# Altium PCB Zybo_Z7_Pcb.PcbDoc (part 2 of 8)
Units mm, origin at the board's own origin, x right, y up, seen from the top; angles counter-clockwise.
Board outline 122 x 88 mm, 8 copper layers (Top Layer, Layer 2, Layer 3, Layer 4, Layer 5, Layer 6, Layer 7, Bottom Layer), stack 1.625 mm thick; 658 components, 558 nets, 2538 pads, 924 vias.
Unrouted connection lines stored in the file: 1229.
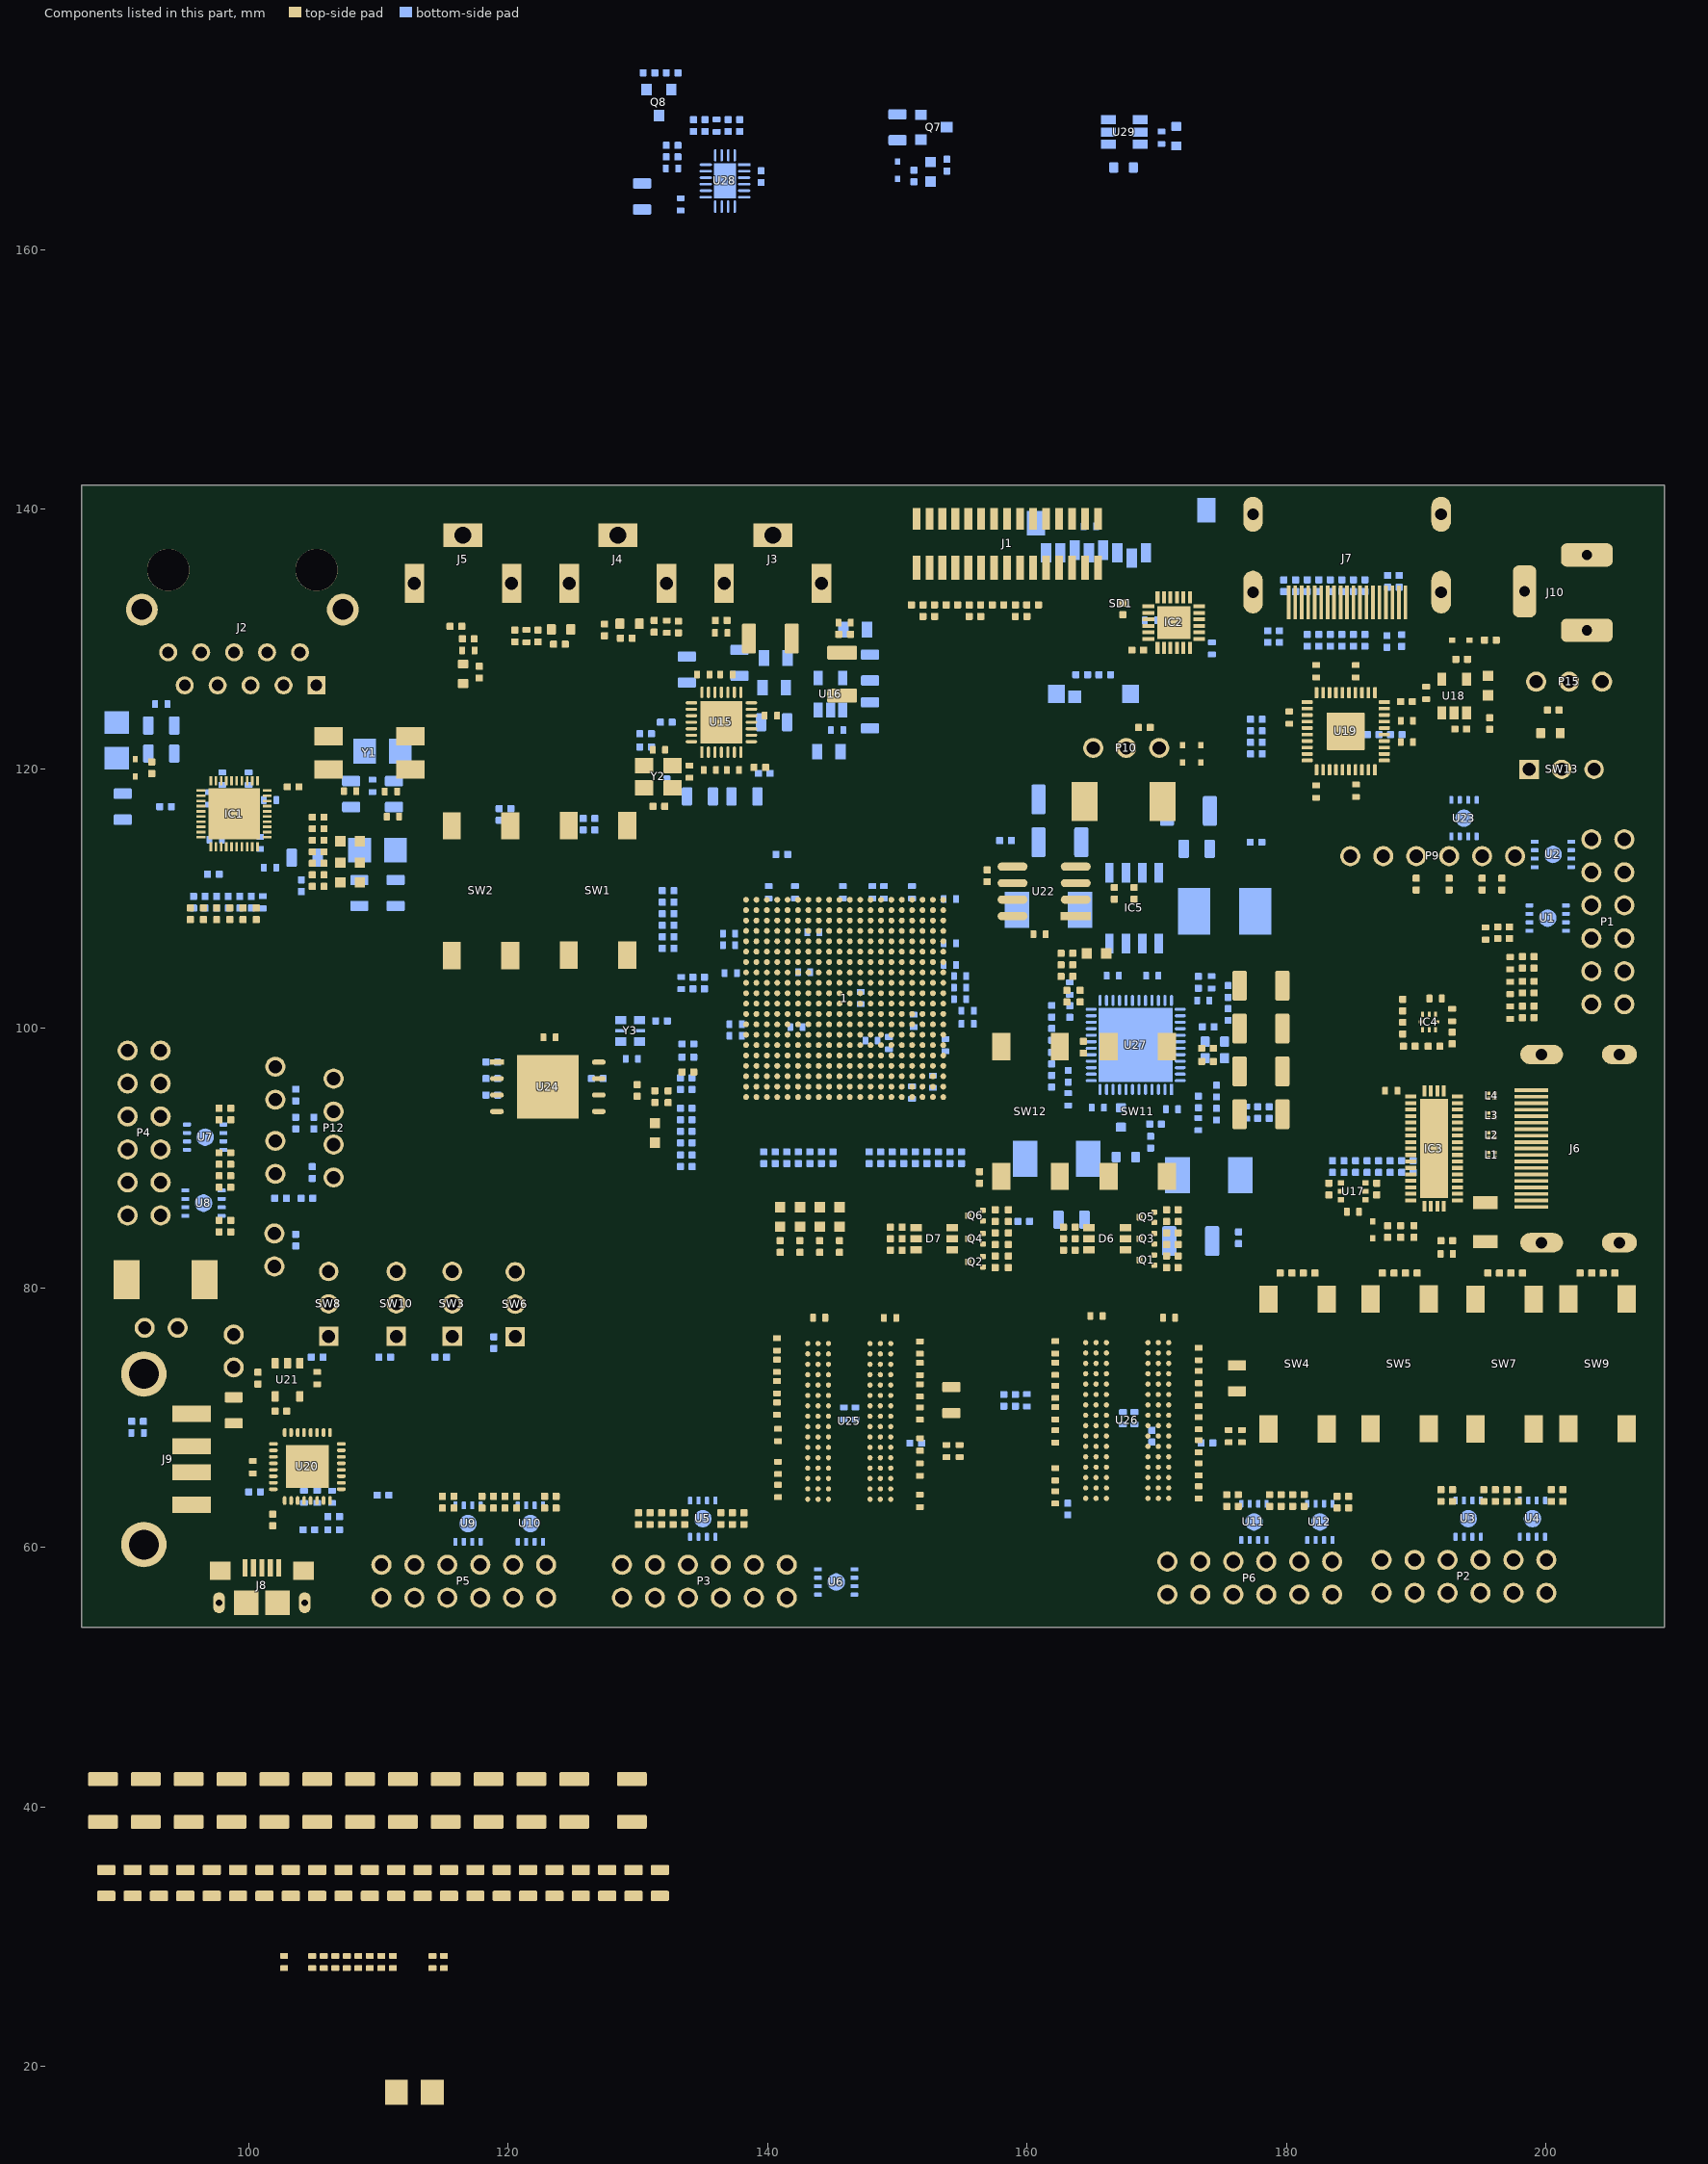
[diagram p8: the components of this part, seen from the top]

## Components (designator, comment, footprint, x,y, rotation, side; value= is the part's Value field where it differs from the comment) (continued)
C109 "470n" CAPC1005X50N_0402 110.236,28.067 r90 top
C110 "470n" CAPC1005X50N_0402 155.423,101.371 r0 bottom
C111 "47u" C_1210 121.793,40.513 r90 top
C112 "470n" CAPC1005X50N_0402 154.051,106.553 r180 bottom
C113 "470n" CAPC1005X50N_0402 154.051,104.902 r180 bottom
C114 "470n" CAPC1005X50N_0402 142.113,110.49 r270 bottom
C115 "470n" CAPC1005X50N_0402 137.541,100.33 r0 bottom
C116 "470n" CAPC1005X50N_0402 137.541,99.441 r0 bottom
C117 "4u7" C_0805 119.507,34.163 r90 top
C118 "4u7" C_0805 121.539,34.163 r90 top
C119 "4u7" C_0805 123.571,34.163 r90 top
C120 "100u" C_1210 118.491,40.513 r90 top
C121 "4u7" C_0805 103.251,34.163 r90 top
C122 "470n" CAPC1005X50N_0402 151.13,110.49 r270 bottom
C123 "470n" CAPC1005X50N_0402 154.051,109.982 r180 bottom
C124 "47u" C_1210 95.377,40.513 r90 top
C125 "470n" CAPC1005X50N_0402 154.838,104.038 r0 bottom
C126 "470n" CAPC1005X50N_0402 147.169,102.351 r90 bottom
C127 "4u7" C_0805 105.283,34.163 r90 top
C128 "100u" C_1210 92.075,40.513 r90 top
C129 "470n" CAPC1005X50N_0402 137.16,104.267 r0 bottom
C130 "470n" CAPC1005X50N_0402 137.033,106.426 r0 bottom
C131 "470n" CAPC1005X50N_0402 137.033,107.315 r0 bottom
C132 "100u" C_1210 105.283,40.513 r90 top
C133 "4u7" C_0805 109.347,34.163 r90 top
C134 "4u7" C_0805 115.443,34.163 r90 top
C135 "470n" CAPC1005X50N_0402 142.821,104.345 r0 bottom
C136 "470n" CAPC1005X50N_0402 105.791,28.067 r90 top
C137 "470n" CAPC1005X50N_0402 104.902,28.067 r90 top
C138 "4u7" C_0805 93.091,34.163 r90 top
C139 "4u7" C_0805 95.123,34.163 r90 top
C140 "100u" C_1210 101.981,40.513 r90 top
C141 "470n" CAPC1005X50N_0402 107.569,28.067 r90 top
C142 "470n" CAPC1005X50N_0402 109.347,28.067 r90 top
C143 "470n" CAPC1005X50N_0402 108.458,28.067 r90 top
C144 "470n" CAPC1005X50N_0402 111.125,28.067 r90 top
C145 "470n" CAPC1005X50N_0402 106.68,28.067 r90 top
C146 "100u" C_1210 88.773,40.513 r90 top
C147 "4u7" C_0805 101.219,34.163 r90 top
C148 "4u7" C_0805 111.379,34.163 r90 top
C149 "4u7" C_0805 113.411,34.163 r90 top
C150 "4u7" C_0805 117.475,34.163 r90 top
C151 "4u7" C_0805 91.059,34.163 r90 top
C152 "470n" CAPC1005X50N_0402 154.838,103.149 r0 bottom
C153 "470n" CAPC1005X50N_0402 142.222,100.115 r180 bottom
C154 "470n" CAPC1005X50N_0402 154.838,102.26 r0 bottom
C155 "100u" C_1210 115.189,40.513 r90 top
C156 "470n" CAPC1005X50N_0402 102.743,28.067 r90 top
C157 "10u" C_0805 89.027,34.163 r90 top
C158 "10n" CAPC1005X50N_0402 145.887,70.333 r90 bottom
C159 "10n" CAPC1005X50N_0402 167.385,69.967 r90 bottom
C160 "10n" CAPC1005X50N_0402 146.776,70.333 r270 bottom
C161 "10n" CAPC1005X50N_0402 168.274,69.967 r270 bottom
C162 "47n" CAPC1005X50N_0402 162.178,73.777 r90 top
C163 "47n" CAPC1005X50N_0402 173.227,66.03 r90 top
C164 "47n" CAPC1005X50N_0402 173.227,64.252 r90 top
C165 "47n" CAPC1005X50N_0402 162.178,71.999 r270 top
C166 "47n" CAPC1005X50N_0402 162.178,63.871 r90 top
C167 "47n" CAPC1005X50N_0402 162.178,70.348 r270 top
C168 "47n" CAPC1005X50N_0402 162.178,65.649 r90 top
C169 "47n" CAPC1005X50N_0402 162.178,75.428 r90 top
C170 "47n" CAPC1005X50N_0402 140.716,72.36 r90 top
C171 "47n" CAPC1005X50N_0402 140.716,74.011 r90 top
C172 "47n" CAPC1005X50N_0402 140.716,70.709 r90 top
C173 "47n" CAPC1005X50N_0402 151.729,63.602 r90 top
C174 "47n" CAPC1005X50N_0402 151.755,67.946 r90 top
C175 "47n" CAPC1005X50N_0402 151.729,70.333 r270 top
C176 "47n" CAPC1005X50N_0402 151.729,73.762 r90 top
C177 "47n" CAPC1005X50N_0402 151.729,75.413 r270 top
C178 "47n" CAPC1005X50N_0402 165.348,77.857 r180 top
C179 "47n" CAPC1005X50N_0402 162.178,68.57 r90 top
C180 "47n" CAPC1005X50N_0402 170.941,77.714 r180 top
C181 "47n" CAPC1005X50N_0402 173.227,74.92 r270 top
C182 "47n" CAPC1005X50N_0402 173.227,73.142 r270 top
C183 "47n" CAPC1005X50N_0402 173.227,71.364 r90 top
C184 "47n" CAPC1005X50N_0402 173.227,69.586 r90 top
C185 "47n" CAPC1005X50N_0402 173.227,67.808 r90 top
C186 "47n" CAPC1005X50N_0402 151.729,66.015 r90 top
C187 "47n" CAPC1005X50N_0402 140.807,64.364 r270 top
C188 "47n" CAPC1005X50N_0402 140.807,66.142 r270 top
C189 "47n" CAPC1005X50N_0402 140.807,68.682 r270 top
C190 "47n" CAPC1005X50N_0402 140.716,75.662 r90 top
C191 "47n" CAPC1005X50N_0402 143.977,77.714 r180 top
C192 "47n" CAPC1005X50N_0402 151.729,72.111 r90 top
C193 "47n" CAPC1005X50N_0402 149.443,77.699 r180 top
C194 "470n" CAPC1005X50N_0402 175.539,68.583 r270 top
C195 "470n" CAPC1005X50N_0402 176.555,68.583 r270 top
C196 "4u7" C_0805 176.174,73.041 r270 top
C197 "470n" CAPC1005X50N_0402 153.787,67.438 r90 top
C198 "470n" CAPC1005X50N_0402 154.803,67.438 r90 top
C199 "4u7" C_0805 154.168,71.375 r90 top
C200 "47u" C_1210 178.029,93.396 r0 top
C201 "22u" C_1210 178.029,96.698 r0 top
C202 "22u" C_1210 178.029,100 r0 top
C203 "22u" C_1210 178.029,103.302 r0 top
C204 "1u" C_0402 174.473,98.984 r180 bottom
C205 "1u" C_0402 167.234,93.142 r90 bottom
C206 "4p7" CAPC1005X50N_0402 173.584,102.159 r0 bottom
C207 "1u" C_0402 174.473,97.714 r180 bottom
C208 "100n" CAPC1005X50N_0402 169.647,104.064 r0 bottom
C209 "1n2" CAPC1005X50N_0402 174.219,103.556 r270 bottom
C210 "1u" C_0402 200.343,122.758 r0 top
C211 "4u7" C_0805 173.076,113.843 r0 bottom
C212 "47u" C_1210 172.441,116.764 r180 bottom
C213 "2n7" CAPC1005X50N_0402 163.297,103.081 r270 bottom
C214 "2n2" CAPC1005X50N_0402 176.886,93.523 r270 bottom
C215 "100n" CAPC1005X50N_0402 166.599,104.064 r0 bottom
C216 "47u" C_1210 162.535,117.653 r0 bottom
C217 "47u" C_1210 162.535,114.351 r0 bottom
C218 "100n" CAPC1005X50N_0402 171.171,93.777 r180 bottom
C219 "1n" CAPC1005X50N_0402 173.203,92.634 r90 bottom
C220 "47u" C_1210 172.618,83.617 r180 bottom
C221 "100n" CAPC1005X50N_0402 165.456,93.904 r0 bottom
C222 "3n9" CAPC1005X50N_0402 163.17,94.539 r90 bottom
C223 "10u" C_0805 163.424,85.268 r180 bottom
C224 "4u7" C_0805 150.012,169.443 r270 bottom
C225 "1u" C_0402 167.615,90.094 r0 bottom
C226 "1u" C_0805 130.327,164.109 r270 bottom
C227 "1n" CAPC1005X50N_0402 132.639,166.268 r0 bottom
C228 "1u" C_0402 171.501,168.758 r270 bottom
C229 "100n" CAPC1005X50N_0402 170.358,168.631 r270 bottom
C230 "1u" C_0402 167.437,166.345 r180 bottom
C231 "10n" CAPC1005X50N_0402 136.068,169.57 r270 bottom
C232 "4u7" C_0805 98.849,70.582 r270 top
C233 "150u" FP-TAJD-MFG 93.599,80.645 r180 top
D1 "BAS16XV2T1G" ONSC-SOD-523-2-502-01_V 91.262,120.091 r270 top
D2 "BAS16XV2T1G" ONSC-SOD-523-2-502-01_V 186.639,84.48 r270 top
D6 "150352M173303" WL-SFTW_3528_150352M173303 166.176,83.801 r180 top
D7 "150352M173303" WL-SFTW_3528_150352M173303 152.841,83.801 r180 top
D12 "BAS16XV2T1G" ONSC-SOD-523-2-502-01_V 193.424,129.928 r0 top
D15 "BAS16XV2T1G" ONSC-SOD-523-2-502-01_V 171.983,121.158 r90 top
D16 "CDBU0130L" FP-502-01-MFG 173.38,121.158 r90 top value=7pF
D18 "BAS16XV2T1G" ONSC-SOD-523-2-502-01_V 150.012,166.141 r90 bottom
DS1 "19-217/Y5C-AM1N1VY/3T" EVRL-0603-2_V 131.31,91.958 r270 top
DS2 "19-217/Y5C-AM1N1VY/3T" EVRL-0603-2_V 145.542,85.483 r90 top
DS3 "19-217/Y5C-AM1N1VY/3T" EVRL-0603-2_V 144.018,85.483 r90 top
DS4 "19-217/Y5C-AM1N1VY/3T" EVRL-0603-2_V 142.494,85.483 r90 top
DS5 "19-217/Y5C-AM1N1VY/3T" EVRL-0603-2_V 140.97,85.483 r90 top
DS6 "19-217/Y5C-AM1N1VY/3T" EVRL-0603-2_V 107.823,112.776 r0 top
DS7 "19-217/Y5C-AM1N1VY/3T" EVRL-0603-2_V 107.823,111.252 r180 top
DS8 "19-217/Y5C-AM1N1VY/3T" EVRL-0603-2_V 107.823,114.427 r180 top
DS9 "19-217/Y5C-AM1N1VY/3T" EVRL-0603-2_V 195.529,126.416 r270 top
DS10 "19-217/Y5C-AM1N1VY/3T" EVRL-0603-2_V 165.354,105.791 r0 top
DS11 "19-217/Y5C-AM1N1VY/3T" EVRL-0603-2_V 152.552,166.014 r90 bottom
F1 "0ZCJ0020FF2E" FP-0ZCJ-MFG 195.326,85.09 r90 top
FB1 "600" FP-BLM31-0_2-t1_6-IPC_A 89.84,122.199 r270 bottom
FB2 "600" FP-BLM31-0_2-t1_6-IPC_A 110.312,121.361 r0 bottom
FB3 "MPZ2012S601AT000" FP-MPZ2012-MFG 140.503,126.263 r0 bottom
FB4 "MPZ2012S601AT000" FP-MPZ2012-MFG 140.63,128.549 r0 bottom
FB5 "MPZ2012S601AT000" FP-MPZ2012-MFG 146.752,130.734 r180 bottom
FB6 "MPZ2012S601AT000" FP-MPZ2012-MFG 144.72,121.336 r0 bottom
FB7 "600" FP-BLM31-0_2-t1_6-IPC_A 112.776,18.034 r180 top
FB8 "600" FP-BLM31-0_2-t1_6-IPC_A 109.931,113.741 r0 bottom
IC1 "RTL8211F-CG" QFN40P500X500X90-41N-D 98.882,116.535 r270 top
IC2 "TXS02612RTWR" QFN50P400X400X80-25N-D 171.303,131.273 r90 top
IC3 "TS3DV642A0RUAR" QFN50P350X900X80-43N-D 191.364,90.754 r0 top
IC4 "GTL2002GM,125" GTL2002GM125 190.983,100.498 r270 top
IC5 "FDS9926A" SOIC127P600X175-8N 168.25,109.271 r270 bottom
J1 "1-1734248-5" FP-1-1734248-5-MFG 158.471,137.516 r180 top
J2 "HFJ11-1G01ERL" FP-HFJ11-1G01ERL-MFG 99.517,135.436 r180 top
J3 "PJRAN1X1U01X" SWIT-PJRAN1X1U01X_V 140.402,137.998 r180 top
J4 "PJRAN1X1U01X" SWIT-PJRAN1X1U01X_V 128.464,137.998 r180 top
J5 "PJRAN1X1U01X" SWIT-PJRAN1X1U01X_V 116.526,137.998 r180 top
J6 "685119134923" 685119134923 -1065.818,1360.746 r90 top
J7 "685119134923" 685119134923 -1085.337,-1131.852 r180 top
J8 "10118193-0001LF" FCI-10118193-0001LF-5_V 101.022,57.103 r0 top
J9 "292303-7" FP-292303-7-MFG 88.647,66.806 r0 top
J10 "694108301002" 694108301002 203.149,137.033 r180 top
L1 "TCM06U" TCM06U_DFN65X50X35-4N 195.809,90.246 r180 top
L2 "TCM06U" TCM06U_DFN65X50X35-4N 195.809,91.77 r180 top
L3 "TCM06U" TCM06U_DFN65X50X35-4N 195.809,93.294 r180 top
L4 "TCM06U" TCM06U_DFN65X50X35-4N 195.809,94.818 r180 top
L6 "3u3" ETQP3M_4M_YFP 175.235,109.017 r0 bottom
L7 "1u5" FP-IHLP-2020CZ-FP_1_905x2-MFG 161.646,109.144 r180 bottom
L8 "3u3" FP-IHLP-2020CZ-FP_1_905x2-MFG 174.015,88.697 r0 bottom
L9 "3u3" FP-IHLP-2020CZ-FP_1_905x2-MFG 162.281,89.967 r180 bottom
P1 "Male Pin Header 2x6 2.54mm" "Copy of Copy of Copy of 3M-2340-6111TG_V" 201.59,116.603 r270 top
P2 "Male Pin Header 2x6 2.54mm" "Copy of Copy of Copy of 3M-2340-6111TG_V" 202.057,60.96 r180 top
P3 "Male Pin Header 2x6 2.54mm" "Copy of Copy of Copy of 3M-2340-6111TG_V" 143.51,60.579 r180 top
P4 "Male Pin Header 2x6 2.54mm" "Copy of Copy of Copy of 3M-2340-6111TG_V" 95.123,83.566 r90 top
P5 "Male Pin Header 2x6 2.54mm" "Copy of Copy of Copy of 3M-2340-6111TG_V" 124.968,60.579 r180 top
P6 "Male Pin Header 2x6 2.54mm" "Copy of Copy of Copy of 3M-2340-6111TG_V" 185.547,60.833 r180 top
P7 "Male Pin Header 2x1 2.54mm" "Copy of Copy of Copy of Copy of 3M-2340-6111TG_V"#1 100.754,71.851 r90 top
P8 "Male Pin Header 2x1 2.54mm" "Copy of Copy of Copy of Copy of 3M-2340-6111TG_V"#1 96.563,78.837 r180 top
P9 "Male Pin Header 1x6 2.54mm" "Copy of Copy of Copy of Copy of 3M-2340-6111TG_V"#2 199.644,115.189 r180 top
P10 "Male Pin Header 1x3 2.54mm" "Copy of Copy of Copy of Copy of Copy of 3M-2340-6111TG_V"#1 172.212,123.52 r180 top
P11 "Male Pin Header 2x1 2.54mm" "Copy of Copy of Copy of Copy of 3M-2340-6111TG_V"#1 100.152,99.085 r270 top
P12 "Male Pin Header 1x4 2.54mm" "Copy of Copy of Copy of Copy of Copy of 3M-2340-6111TG_V"#2 108.458,86.487 r90 top
P13 "Male Pin Header 2x1 2.54mm" "Copy of Copy of Copy of Copy of 3M-2340-6111TG_V"#1 100.152,93.37 r270 top
P14 "Male Pin Header 2x1 2.54mm" "Copy of Copy of Copy of Copy of 3M-2340-6111TG_V"#1 103.886,79.629 r90 top
P15 "Male Pin Header 1x3 2.54mm" "Copy of Copy of Copy of Copy of Copy of 3M-2340-6111TG_V"#1 206.35,128.626 r180 top
Q1 "MMBT2222AM3T5G" ROHM-SOT723-3_V 169.224,82.15 r180 top
Q2 "MMBT2222AM3T5G" ROHM-SOT723-3_V 156.016,82.023 r180 top
Q3 "MMBT2222AM3T5G" ROHM-SOT723-3_V 169.224,83.801 r180 top
Q4 "MMBT2222AM3T5G" ROHM-SOT723-3_V 156.016,83.801 r180 top
Q5 "MMBT2222AM3T5G" ROHM-SOT723-3_V 169.224,85.452 r180 top
Q6 "MMBT2222AM3T5G" ROHM-SOT723-3_V 156.016,85.579 r180 top
Q7 "FDV301N" FP-318-08-MFG 152.806,169.443 r0 bottom
Q8 "FDV301N" FP-318-08-MFG 131.623,171.348 r270 bottom
R1 "0" R_0402 200.406,64.008 r270 top
R2 "0" R_0402 201.295,64.008 r90 top
R3 "0" R_0402 196.977,64.008 r270 top
R4 "0" R_0402 197.866,64.008 r90 top
R5 "0" R_0402 195.199,64.008 r270 top
R6 "0" R_0402 196.088,64.008 r90 top
R7 "0" R_0402 191.897,64.008 r270 top
R8 "0" R_0402 192.786,64.008 r90 top
R9 "0" R_0402 138.176,62.23 r270 top
R10 "0" R_0402 137.287,62.23 r90 top
R11 "0" R_0402 98.171,85.217 r180 top
R12 "0" R_0402 98.171,84.328 r0 top
R13 "0" R_0402 136.398,62.23 r270 top
R14 "0" R_0402 133.604,62.23 r90 top
R15 "0" R_0402 98.171,88.646 r180 top
R16 "0" R_0402 98.171,87.757 r0 top
R17 "0" R_0402 132.715,62.23 r270 top
R18 "0" R_0402 131.826,62.23 r90 top
R19 "0" R_0402 98.171,90.424 r180 top
R20 "0" R_0402 98.171,89.535 r0 top
R21 "0" R_0402 130.937,62.23 r270 top
R22 "0" R_0402 130.048,62.23 r90 top
R23 "0" R_0402 98.171,93.853 r180 top
R24 "0" R_0402 98.171,92.964 r0 top
R25 "200" R_0402 122.809,63.5 r270 top
R26 "200" R_0402 123.698,63.5 r90 top
R27 "200" R_0402 183.896,63.5 r270 top
R28 "200" R_0402 184.785,63.5 r90 top
R29 "200" R_0402 119.761,63.5 r270 top
R30 "200" R_0402 120.65,63.5 r90 top
R31 "200" R_0402 180.467,63.627 r270 top
R32 "200" R_0402 181.356,63.627 r90 top
R33 "200" R_0402 117.983,63.5 r270 top
R34 "200" R_0402 118.872,63.5 r90 top
R35 "200" R_0402 178.689,63.627 r270 top
R36 "200" R_0402 179.578,63.627 r90 top
R37 "200" R_0402 115.824,63.5 r270 top
R38 "200" R_0402 114.935,63.5 r90 top
R39 "200" R_0402 176.276,63.627 r270 top
R40 "200" R_0402 175.387,63.627 r90 top
R41 "10k" R_0402 126.238,116.18 r0 bottom
R42 "10k" R_0402 119.761,116.942 r0 bottom
R43 "330" R_0402 131.31,94.752 r90 top
R44 "10k" R_0402 119.761,116.053 r180 bottom
R45 "10k" R_0402 126.238,115.291 r180 bottom
R46 "100" R_0402 153.314,132.639 r180 top
R47 "100" R_0402 156.87,132.639 r180 top
R48 "100" R_0402 160.426,132.639 r180 top
R49 "150" R_0402 152.425,131.75 r180 top
R50 "150" R_0402 155.981,131.75 r180 top
R51 "150" R_0402 159.537,131.75 r180 top
R52 "100" R_0402 151.536,132.639 r0 top
R53 "100" R_0402 155.092,132.639 r0 top
R54 "100" R_0402 158.648,132.639 r0 top
R55 "10k" R_0402 181.737,81.153 r180 top
R56 "10k" R_0402 114.808,74.676 r180 bottom
R57 "10k" R_0402 189.611,81.153 r180 top
R58 "330" R_0402 145.542,83.197 r270 top
R59 "10k" R_0402 197.739,81.153 r180 top
R60 "10k" R_0402 118.897,75.794 r90 bottom
R61 "330" R_0402 144.018,83.197 r270 top
R62 "330" R_0402 142.494,83.197 r270 top
R63 "10k" R_0402 204.851,81.153 r180 top
R64 "10k" R_0402 105.283,74.676 r180 bottom
R65 "330" R_0402 140.97,83.197 r270 top
R66 "10k" R_0402 203.073,81.153 r180 top
R67 "10k" R_0402 195.961,81.153 r180 top
R68 "10k" R_0402 187.833,81.153 r180 top
R69 "10k" R_0402 179.959,81.153 r180 top
R70 "10k" R_0402 110.49,74.676 r180 bottom
R71 "86R6" R_0402 163.255,82.912 r0 top
R72 "86R6" R_0402 149.92,82.912 r0 top
R73 "75" R_0402 163.255,83.801 r0 top
R74 "2k2" R_0402 170.748,82.023 r90 top
R75 "75" R_0402 149.92,83.801 r0 top
R76 "2k2" R_0402 157.54,82.023 r90 top
R77 "150" R_0402 163.255,84.69 r0 top
R78 "150" R_0402 149.92,84.69 r0 top
R79 "2k2" R_0402 170.748,83.801 r90 top
R80 "2k2" R_0402 157.54,83.801 r90 top
R81 "2k2" R_0402 170.748,85.579 r90 top
R82 "2k2" R_0402 157.54,85.579 r90 top
R83 "2k2" R_0402 171.637,85.579 r90 top
R84 "2k2" R_0402 171.637,83.801 r90 top
R85 "2k2" R_0402 171.637,82.023 r90 top
R86 "2k2" R_0402 158.556,85.579 r90 top
R87 "2k2" R_0402 158.556,83.801 r90 top
R88 "2k2" R_0402 158.556,82.023 r90 top
R89 "0" R_0402 104.064,110.998 r90 bottom
R90 "4k7" R_0402 92.532,120.091 r90 top
R91 "27k" R_0402 187.782,84.353 r270 top
R93 "0" R_0402 98.552,108.839 r90 top
R94 "4k7" R_0402 98.425,109.728 r270 bottom
R95 "4k7" R_0402 97.536,109.728 r270 bottom
R96 "4k7" R_0402 96.647,109.728 r270 bottom
R97 "4k7" R_0402 95.758,109.728 r270 bottom
R98 "0" R_0402 97.536,108.839 r90 top
R99 "0" R_0402 96.52,108.839 r90 top
R100 "0" R_0402 95.504,108.839 r90 top
R101 "0" R_0402 99.568,108.839 r90 top
R102 "0" R_0402 100.584,108.839 r90 top
R103 "1k2" R_0402 99.314,109.728 r90 bottom
R104 "1k2" R_0402 100.203,109.728 r90 bottom
R105 "1k2" R_0402 97.282,111.887 r180 bottom
R106 "4k7" R_0402 105.359,110.947 r180 top
R107 "4k7" R_0402 105.359,114.503 r180 top
R108 "1k5" R_0402 93.599,117.094 r0 bottom
R109 "390" R_0402 105.359,111.836 r0 top
R110 "390" R_0402 105.359,112.725 r0 top
R111 "390" R_0402 105.359,115.392 r0 top
R112 "4k7" R_0402 105.359,113.614 r0 top
R113 "2k49/1%" R_0402 103.429,118.618 r0 top
R114 "0" R_0402 105.359,116.281 r0 top
R115 "4k7" R_0402 167.386,132.334 r90 top
R116 "200" R_0402 164.211,127.254 r0 bottom
R117 "47k" R_0402 165.989,127.254 r0 bottom
R118 "4k7" R_0402 168.529,129.159 r0 top
R119 "0" R_0402 139.741,119.659 r0 bottom
R120 "0" R_0402 132.232,118.77 r90 bottom
R121 "47k" R_0402 145.939,130.378 r0 top
R122 "47k" R_0402 136.423,131.445 r180 top
R123 "0" R_0402 139.395,120.117 r180 top
R124 "0" R_0402 129.108,130.073 r0 top
R125 "680" R_0402 131.258,130.988 r270 top
R126 "47k" R_0402 133.121,130.937 r270 top
R127 "10MEG" R_0402 127.432,130.708 r270 top
R128 "0" R_0402 131.623,117.119 r180 top
R129 "0" R_0402 120.523,130.242 r90 top
R130 "100k" R_0402 132.19,123.596 r180 bottom
R131 "0" R_0402 115.976,130.988 r0 top
R132 "1k5" R_0402 130.597,121.691 r180 bottom
R133 "1k5" R_0402 130.597,122.707 r180 bottom
R134 "10MEG" R_0402 123.952,129.607 r180 top
R135 "10MEG" R_0402 117.78,127.457 r90 top
R136 "47k" R_0402 122.301,130.242 r270 top
R137 "47k" R_0402 116.932,130.023 r0 top
R138 "10k" R_0402 183.261,87.63 r90 top
R139 "47k" R_0402 186.944,87.63 r270 top
R140 "1M" R_0402 192.347,83.642 r180 top
R141 "49R9" R_0402 183.54,89.357 r90 bottom
R142 "49R9" R_0402 184.429,89.357 r90 bottom
R143 "49R9" R_0402 185.318,89.357 r90 bottom
R144 "49R9" R_0402 186.207,89.357 r90 bottom
R145 "49R9" R_0402 187.096,89.357 r90 bottom
R146 "49R9" R_0402 187.985,89.357 r90 bottom
R147 "49R9" R_0402 188.874,89.357 r90 bottom
R148 "49R9" R_0402 189.763,89.357 r90 bottom
R149 "200k" R_0402 192.761,99.263 r270 top
R150 "10k" R_0402 188.798,84.353 r90 top
R151 "1k" R_0402 188.951,101.803 r270 top
R152 "1k" R_0402 188.951,100.025 r90 top
R153 "1k5" R_0402 191.364,98.628 r180 top
R154 "1k5" R_0402 189.459,98.628 r0 top
R155 "10k" R_0402 189.814,84.353 r270 top
R156 "1k" R_0402 193.497,128.448 r0 top
R157 "100k" R_0402 193.424,123.07 r180 top
R158 "49R9" R_0402 186.039,129.905 r270 bottom
R159 "49R9" R_0402 185.15,129.905 r270 bottom
R160 "49R9" R_0402 183.372,129.905 r270 bottom
R161 "49R9" R_0402 184.261,129.905 r270 bottom
R162 "49R9" R_0402 181.594,129.905 r270 bottom
R163 "49R9" R_0402 182.483,129.905 r270 bottom
R164 "49R9" R_0402 179.003,130.642 r180 bottom
R165 "49R9" R_0402 179.003,129.753 r180 bottom
R166 "27k" R_0402 195.71,129.928 r180 top
R167 "10k" R_0402 188.455,122.647 r0 bottom
R168 "10k" R_0402 177.673,122.047 r180 bottom
R169 "10k" R_0402 177.673,123.825 r180 bottom
R170 "4k64/1%" R_0402 189.243,125.187 r180 top
R171 "470" R_0402 195.656,123.495 r90 top
R172 "10k" R_0402 186.677,122.647 r0 bottom
R173 "10k" R_0402 177.673,121.158 r0 bottom
R174 "10k" R_0402 177.673,122.936 r0 bottom
R175 "49R9" R_0402 185.15,134.121 r270 bottom
R176 "49R9" R_0402 186.039,134.121 r270 bottom
R177 "49R9" R_0402 183.372,134.121 r270 bottom
R178 "49R9" R_0402 184.261,134.121 r270 bottom
R179 "49R9" R_0402 181.594,134.121 r270 bottom
R180 "49R9" R_0402 182.483,134.121 r270 bottom
R181 "49R9" R_0402 180.696,134.112 r270 bottom
R182 "49R9" R_0402 179.781,134.112 r270 bottom
R183 "1k5" R_0402 187.731,129.819 r270 bottom
R184 "1k5" R_0402 188.874,129.896 r270 bottom
R185 "47k" R_0402 188.681,134.458 r270 bottom
R186 "47k" R_0402 187.792,134.458 r270 bottom
R187 "0" R_0402 106.554,62.388 r0 bottom
R188 "0" R_0402 106.554,61.372 r0 bottom
R189 "1k" R_0402 100.458,64.293 r180 bottom
R190 "1k" R_0402 100.712,73.056 r90 top
R191 "100k" R_0402 110.364,64.039 r180 bottom
R192 "100k" R_0402 102.49,70.516 r0 top
R193 "1M" R_0402 91.441,69.727 r180 bottom
R194 "1k5" R_0402 104.649,61.372 r0 bottom
R195 "8R06/1%" R_0402 101.855,62.134 r270 top
R196 "100" R_0402 196.596,111.125 r90 top
R197 "100" R_0402 195.072,111.125 r90 top
R198 "1k5" R_0402 156.921,111.76 r270 top
R199 "100" R_0402 192.532,111.125 r90 top
R200 "100" R_0402 189.992,111.125 r90 top
R201 "4k7" R_0402 164.338,98.552 r270 top
R202 "4k7" R_0402 163.068,104.013 r0 top
R203 "220" R_0402 163.068,104.902 r0 top
R204 "4k7" R_0402 118.745,97.409 r180 bottom
R205 "220" R_0402 163.068,105.791 r180 top
R206 "0" R_0402 169.037,123.19 r0 top
R207 "30" R_0402 132.334,110.617 r0 bottom
R208 "30" R_0402 132.334,107.95 r0 bottom
R209 "10 / 1%" R_0402 133.731,92.075 r180 bottom
R210 "30" R_0402 132.334,109.728 r0 bottom
R211 "10 / 1%" R_0402 133.731,93.853 r180 bottom
R212 "30" R_0402 132.334,106.172 r0 bottom
R213 "10 / 1%" R_0402 133.731,95.301 r180 bottom
R214 "30" R_0402 132.334,108.839 r0 bottom
R215 "10 / 1%" R_0402 133.731,91.186 r180 bottom
R216 "30" R_0402 132.334,107.061 r0 bottom
R217 "10 / 1%" R_0402 133.731,96.19 r180 bottom
R218 "24" R_0402 133.858,96.647 r0 top
R219 "10 / 1%" R_0402 133.731,92.964 r180 bottom
R220 "10 / 1%" R_0402 144.145,90.043 r270 bottom
R221 "10 / 1%" R_0402 139.7,90.043 r270 bottom
R222 "10 / 1%" R_0402 140.589,90.043 r270 bottom
R223 "10 / 1%" R_0402 145.034,90.043 r270 bottom
R224 "10 / 1%" R_0402 141.478,90.043 r270 bottom
R225 "10 / 1%" R_0402 143.256,90.043 r270 bottom
R226 "10 / 1%" R_0402 148.717,90.043 r270 bottom
R227 "10 / 1%" R_0402 142.367,90.043 r270 bottom
R228 "10 / 1%" R_0402 149.606,90.043 r270 bottom
R229 "10 / 1%" R_0402 133.731,90.246 r180 bottom
R230 "10 / 1%" R_0402 152.273,90.043 r270 bottom
R231 "10 / 1%" R_0402 133.731,89.357 r180 bottom
R232 "10k" R_0402 158.206,71.349 r270 bottom
R233 "10k" R_0402 135.128,103.505 r270 bottom
R234 "40R2 / 1%" R_0402 141.097,113.411 r180 bottom
R235 "10 / 1%" R_0402 151.384,90.043 r270 bottom
R236 "10 / 1%" R_0402 154.051,90.043 r270 bottom
R237 "10 / 1%" R_0402 147.828,90.043 r270 bottom
R238 "10 / 1%" R_0402 153.162,90.043 r270 bottom
R239 "10k" R_0402 159.095,71.349 r90 bottom
R240 "10k" R_0402 134.239,103.505 r90 bottom
R241 "10 / 1%" R_0402 150.495,90.043 r270 bottom
R242 "80R6 / 1%" R_0402 169.621,68.58 r90 bottom
R243 "20k" R_0402 129.946,95.225 r90 top
R244 "10 / 1%" R_0402 154.94,90.043 r270 bottom
R245 "20k" R_0402 132.334,94.742 r90 top
R246 "20k" R_0402 118.745,96.139 r0 bottom
R247 "80R6 / 1%" R_0402 133.858,98.806 r180 bottom
R248 "80R6 / 1%" R_0402 133.858,97.79 r180 bottom
R249 "10k" R_0402 156.337,88.519 r270 top
R250 "1k" R_0402 104.902,88.9 r270 bottom
R251 "1k" R_0402 103.632,92.71 r90 bottom
R252 "20k" R_0402 103.632,94.869 r90 bottom
R253 "24" R_0402 131.826,100.584 r180 bottom
R254 "20k" R_0402 126.873,96.139 r0 bottom
R255 "20k" R_0402 118.745,94.869 r0 bottom
R256 "1k" R_0402 105.029,92.71 r270 bottom
R257 "1k" R_0402 102.464,86.919 r0 bottom
R258 "20k" R_0402 104.496,86.919 r0 bottom
R259 "100" R_0402 198.628,102.743 r180 top
R260 "100" R_0402 198.628,105.537 r180 top
R261 "100" R_0402 198.628,103.632 r180 top
R262 "100" R_0402 198.628,104.648 r180 top
R263 "100" R_0402 196.723,106.934 r180 top
R264 "100" R_0402 198.628,100.838 r180 top
R265 "100" R_0402 196.723,107.823 r180 top
R266 "100" R_0402 198.628,101.727 r180 top
R267 "0" R_0402 103.632,83.693 r270 bottom
R268 "240 / 1%" R_0402 151.417,68.047 r180 bottom
R269 "240 / 1%" R_0402 173.862,68.062 r180 bottom
R270 "4k7" R_0402 163.133,62.967 r270 bottom
R271 "0" R_0402 173.907,98.476 r0 top
R272 "0" R_0402 173.907,97.46 r0 top
R273 "10k" R_0402 200.558,124.536 r0 top
R274 "10k2" R_0402 175.489,101.074 r270 bottom
R275 "39k2" R_0402 173.965,100.127 r0 bottom
R276 "31k6" R_0402 175.489,102.852 r90 bottom
R277 "66k5" R_0402 173.203,103.556 r90 bottom
R278 "0" R_0402 177.648,114.351 r180 bottom
R279 "47k" R_0402 168.25,110.414 r90 top
R280 "8k06" R_0402 178.664,93.523 r90 bottom
R281 "47k" R_0402 166.726,110.414 r90 top
R282 "4k7" R_0402 163.297,101.303 r270 bottom
R283 "20k" R_0402 164.084,102.489 r270 top
R284 "0" R_0402 158.344,114.478 r0 bottom
R285 "10k" R_0402 177.775,93.523 r270 bottom
R286 "2k49" R_0402 161.9,101.328 r90 bottom
R287 "4k7" R_0402 163.068,102.489 r90 top
R288 "10k" R_0402 161.9,99.55 r270 bottom
R289 "8k87" R_0402 173.203,94.343 r90 bottom
R290 "0" R_0402 176.301,83.871 r270 bottom
R291 "19k6" R_0402 174.6,93.396 r270 bottom
R292 "28k7" R_0402 174.6,95.174 r90 bottom
R293 "100k" R_0402 151.282,165.691 r90 bottom
R294 "680" R_0402 153.822,166.522 r90 bottom
R295 "20k" R_0402 163.17,96.317 r90 bottom
R296 "0" R_0402 159.741,85.141 r0 bottom
R297 "12k7" R_0402 161.9,95.936 r270 bottom
R298 "10k2" R_0402 161.9,97.714 r90 bottom
R299 "4k99" R_0402 169.52,91.237 r270 bottom
R300 "1k91" R_0402 169.901,92.634 r0 bottom
R301 "1k" R_0402 132.639,168.046 r180 bottom
R302 "20k" R_0402 137.846,169.57 r90 bottom
R303 "1k" R_0402 132.639,167.157 r0 bottom
R304 "20k" R_0402 139.497,165.633 r270 bottom
R305 "3k9" R_0402 136.957,169.57 r90 bottom
R306 "27k" R_0402 134.29,169.57 r90 bottom
R307 "20k" R_0402 130.861,173.634 r180 bottom
R308 "120k" R_0402 135.179,169.57 r270 bottom
R309 "10k" R_0402 132.639,173.634 r180 bottom
SD1 "473521001" MOLX-473521001_V 167.224,132.992 r0 bottom
SW1 "1301.9316.24" FP-1301_9316_24-MFG 126.924,110.642 r90 top
SW2 "1301.9316.24" FP-1301_9316_24-MFG 117.907,110.617 r90 top
SW3 "EG1218" ESWI-EG1218_V 115.697,78.78 r90 top
SW4 "1301.9316.24" FP-1301_9316_24-MFG 180.848,74.135 r90 top
SW5 "1301.9316.24" FP-1301_9316_24-MFG 188.722,74.168 r90 top
SW6 "EG1218" ESWI-EG1218_V 120.548,78.755 r90 top
SW7 "1301.9316.24" FP-1301_9316_24-MFG 196.799,74.135 r90 top
SW8 "EG1218" ESWI-EG1218_V 106.172,78.78 r90 top
SW9 "1301.9316.24" FP-1301_9316_24-MFG 203.962,74.168 r90 top
SW10 "EG1218" ESWI-EG1218_V 111.379,78.78 r90 top
SW11 "1301.9316.24" FP-1301_9316_24-MFG 168.529,93.599 r270 top
SW12 "1301.9316.24" FP-1301_9316_24-MFG 160.274,93.599 r90 top
SW13 "EG1218" ESWI-EG1218_V 201.204,119.964 r0 top
U1 "TVS0701DRBR" FP-DRB0008A-MFG 200.124,108.504 r180 bottom
U2 "TVS0701DRBR" FP-DRB0008A-MFG 200.533,113.411 r180 bottom
U3 "TVS0701DRBR" FP-DRB0008A-MFG 194,62.233 r90 bottom
U4 "TVS0701DRBR" FP-DRB0008A-MFG 198.953,62.233 r90 bottom
U5 "TVS0701DRBR" FP-DRB0008A-MFG 135.001,62.23 r90 bottom
U6 "TVS0701DRBR" FP-DRB0008A-MFG 145.285,57.348 r0 bottom
U7 "TVS0701DRBR" FP-DRB0008A-MFG 96.65,91.623 r0 bottom
U8 "TVS0701DRBR" FP-DRB0008A-MFG 96.523,86.543 r0 bottom
U9 "TVS0701DRBR" FP-DRB0008A-MFG 116.911,61.852 r90 bottom
U10 "TVS0701DRBR" FP-DRB0008A-MFG 121.722,61.852 r90 bottom
U11 "TVS0701DRBR" FP-DRB0008A-MFG 177.49,61.979 r90 bottom
U12 "TVS0701DRBR" FP-DRB0008A-MFG 182.57,61.979 r90 bottom
U15 "SSM2603CPZ-REEL7" FP-CP-28-10-IPC_C 136.439,123.596 r90 top
U16 "ADP150AUJZ-3.3-R7" ADI-UJ-5_M 144.847,125.781 r90 bottom
U17 "NC7WZ07P6X" FP-419AD-01-MFG 185.141,87.452 r180 top
U18 "NC7SZ125M5X" FAIR-SOT23-5_V 192.916,125.61 r90 top
U19 "TMDS141RHAR" RHA0040D_V 184.56,122.901 r0 top
U20 "USB3320C-EZK" MCHP-QFN-32-5x5_V2 104.526,66.245 r180 top
U21 "TPS2051BDBVR" DBV0005A_L 102.998,72.929 r270 top
U22 "ATSHA204A-SSHCZ-T" FP-C04-057-IPC_A 161.315,110.566 r180 top
U23 "TVS0701DRBR" FP-DRB0008A-MFG 193.675,116.205 r90 bottom
U24 "S25FL128SAGNFM003" FP-PG-WSON-8-IPC_A 123.063,95.504 r0 top
U25 "MT41K256M16HA-125AAT" MICT-HA-96 146.294,69.724 r0 top
U26 "MT41K256M16HA-125AAT" MICT-HA-96 167.716,69.796 r0 top
U27 "ADP5052ACPZ-R7" FP-CP-48-13-IPC_B 168.377,98.73 r90 bottom
U28 "TPS25940ARVCR" FP-RVC0020A-IPC_A 136.715,165.306 r180 bottom
U29 "ADR127BUJZ-REEL7" ADI-UJ-6_M 167.482,169.078 r180 bottom
Y1 "25MHz" ABMM25000MHZB2T 109.322,121.234 r180 top
Y2 "ABM8G-12.288MHZ-18-D2Y-T" FP-ABM8G-MFG 131.572,119.405 r180 top
Y3 "DSC1123DL5-212.5000T" FP-C04-1005-MFG 129.413,99.822 r0 bottom

## Footprints (in the part's own frame and the unit in brackets; to place one, negate y for a bottom-side part, rotate by r counter-clockwise, add the part's x,y. Pads: shape width x height; smd on the part's side, far side on the other; paste and mask are expansions set on the pad)
685119134923 [mm] "HDMI SMT Horizontal"
  rect 0.28x2.6 smd: 1(-1265.5,-1264.675) 2(-1266,-1264.675) 3(-1266.5,-1264.675) 4(-1267,-1264.675) 5(-1267.5,-1264.675) 6(-1268,-1264.675) 7(-1268.5,-1264.675) 8(-1269,-1264.675) 9(-1269.5,-1264.675) 10(-1270,-1264.675) 11(-1270.5,-1264.675) 12(-1271,-1264.675) 13(-1271.5,-1264.675) 14(-1272,-1264.675) 15(-1272.5,-1264.675) 16(-1273,-1264.675) 17(-1273.5,-1264.675) 18(-1274,-1264.675) 19(-1274.5,-1264.675)
  oval 1.5x2.7 hole 0.9 slot 2.1 at 90 deg: Shell(-1277.25,-1271.475) Shell(-1262.75,-1271.475)
  oval 1.5x3.3 hole 0.9 slot 2.7 at 90 deg: Shell(-1277.25,-1265.475) Shell(-1262.75,-1265.475)
  silkscreen extent -1277.5,-1274.78 -1262.5,-1263.93, body extent -1277.55,-1276.07 -1262.55,-1263.92, height 6.17
694108301002 [mm] "DC Power Jack Right Angled(6.4)"
  rrect50% 4x1.8 hole 0.8 square: 1(0,6.35) 2(0,0.55)
  rrect50% 1.8x4 hole 0.8 square: 3(4.8,3.35)
  silkscreen extent -4.5,-7.25 4.5,7.25, body extent -4.5,-7.25 5,7.25, height 10.75
ABMM25000MHZB2T [mm]
  rect 2.2x1.4 smd: 1(-3.15,-1.27) 2(-3.15,1.27) 3(3.15,1.27) 4(3.15,-1.27)
  silkscreen extent -4.6,-2.6 3.6,2.6, body extent -3.17,-1.8 2.83,1.8, height 1.2
ADI-UJ-5_M [mm] "SOT23, 5-Leads, Body 2.9x1.6mm, Pitch 0.95mm, IPC Low Density"
  rect 1.15x0.7 smd: 1(-1.225,0.95) 2(-1.225,0) 3(-1.225,-0.95) 4(1.225,-0.95) 5(1.225,0.95)
  silkscreen extent -1.35,-1.45 0.25,1.98, body extent -0.8,-1.45 0.8,1.45, height 1
ADI-UJ-6_M [mm] "SOT23, 6-Leads, Body 2.9x1.6mm, Pitch 0.95mm, IPC Low Density"
  rect 1.15x0.7 smd: 1(-1.225,0.95) 2(-1.225,0) 3(-1.225,-0.95) 4(1.225,-0.95) 5(1.225,0) 6(1.225,0.95)
  silkscreen extent -1.35,-1.45 0.25,1.97, body extent -0.8,-1.45 0.8,1.45, height 1
BGA400C80P20X20_1700X1700X160 [mm]
  round 0.45 smd: A1(-7.6,7.6) A2(-6.8,7.6) A3(-6,7.6) A4(-5.2,7.6) A5(-4.4,7.6) A6(-3.6,7.6) A7(-2.8,7.6) A8(-2,7.6) A9(-1.2,7.6) A10(-0.4,7.6) A11(0.4,7.6) A12(1.2,7.6) A13(2,7.6) A14(2.8,7.6) A15(3.6,7.6) A16(4.4,7.6) A17(5.2,7.6) A18(6,7.6) A19(6.8,7.6) A20(7.6,7.6) B1(-7.6,6.8) B2(-6.8,6.8) B3(-6,6.8) B4(-5.2,6.8) B5(-4.4,6.8) B6(-3.6,6.8) B7(-2.8,6.8) B8(-2,6.8) B9(-1.2,6.8) B10(-0.4,6.8) B11(0.4,6.8) B12(1.2,6.8) B13(2,6.8) B14(2.8,6.8) B15(3.6,6.8) B16(4.4,6.8) B17(5.2,6.8) B18(6,6.8) B19(6.8,6.8) B20(7.6,6.8) C1(-7.6,6) C2(-6.8,6) C3(-6,6) C4(-5.2,6) C5(-4.4,6) C6(-3.6,6) C7(-2.8,6) C8(-2,6) C9(-1.2,6) C10(-0.4,6) C11(0.4,6) C12(1.2,6) C13(2,6) C14(2.8,6) C15(3.6,6) C16(4.4,6) C17(5.2,6) C18(6,6) C19(6.8,6) C20(7.6,6) D1(-7.6,5.2) D2(-6.8,5.2) D3(-6,5.2) D4(-5.2,5.2) D5(-4.4,5.2) D6(-3.6,5.2) D7(-2.8,5.2) D8(-2,5.2) D9(-1.2,5.2) D10(-0.4,5.2) D11(0.4,5.2) D12(1.2,5.2) D13(2,5.2) D14(2.8,5.2) D15(3.6,5.2) D16(4.4,5.2) D17(5.2,5.2) D18(6,5.2) D19(6.8,5.2) D20(7.6,5.2) E1(-7.6,4.4) E2(-6.8,4.4) E3(-6,4.4) E4(-5.2,4.4) E5(-4.4,4.4) E6(-3.6,4.4) E7(-2.8,4.4) E8(-2,4.4) E9(-1.2,4.4) E10(-0.4,4.4) E11(0.4,4.4) E12(1.2,4.4) E13(2,4.4) E14(2.8,4.4) E15(3.6,4.4) E16(4.4,4.4) E17(5.2,4.4) E18(6,4.4) E19(6.8,4.4) E20(7.6,4.4) F1(-7.6,3.6) F2(-6.8,3.6) F3(-6,3.6) F4(-5.2,3.6) F5(-4.4,3.6) F6(-3.6,3.6) F7(-2.8,3.6) F8(-2,3.6) F9(-1.2,3.6) F10(-0.4,3.6) F11(0.4,3.6) F12(1.2,3.6) F13(2,3.6) F14(2.8,3.6) F15(3.6,3.6) F16(4.4,3.6) F17(5.2,3.6) F18(6,3.6) F19(6.8,3.6) F20(7.6,3.6) G1(-7.6,2.8) G2(-6.8,2.8) G3(-6,2.8) G4(-5.2,2.8) G5(-4.4,2.8) G6(-3.6,2.8) G7(-2.8,2.8) G8(-2,2.8) G9(-1.2,2.8) G10(-0.4,2.8) G11(0.4,2.8) G12(1.2,2.8) G13(2,2.8) G14(2.8,2.8) G15(3.6,2.8) G16(4.4,2.8) G17(5.2,2.8) G18(6,2.8) G19(6.8,2.8) G20(7.6,2.8) H1(-7.6,2) H2(-6.8,2) H3(-6,2) H4(-5.2,2) H5(-4.4,2) H6(-3.6,2) H7(-2.8,2) H8(-2,2) H9(-1.2,2) H10(-0.4,2) H11(0.4,2) H12(1.2,2) H13(2,2) H14(2.8,2) H15(3.6,2) H16(4.4,2) H17(5.2,2) H18(6,2) H19(6.8,2) H20(7.6,2) J1(-7.6,1.2) J2(-6.8,1.2) J3(-6,1.2) J4(-5.2,1.2) J5(-4.4,1.2) J6(-3.6,1.2) J7(-2.8,1.2) J8(-2,1.2) J9(-1.2,1.2) J10(-0.4,1.2) J11(0.4,1.2) J12(1.2,1.2) J13(2,1.2) J14(2.8,1.2) J15(3.6,1.2) J16(4.4,1.2) J17(5.2,1.2) J18(6,1.2) J19(6.8,1.2) J20(7.6,1.2) K1(-7.6,0.4) K2(-6.8,0.4) K3(-6,0.4) K4(-5.2,0.4) K5(-4.4,0.4) K6(-3.6,0.4) K7(-2.8,0.4) K8(-2,0.4) K9(-1.2,0.4) K10(-0.4,0.4) K11(0.4,0.4) K12(1.2,0.4) K13(2,0.4) K14(2.8,0.4) K15(3.6,0.4) K16(4.4,0.4) K17(5.2,0.4) K18(6,0.4) K19(6.8,0.4) K20(7.6,0.4) L1(-7.6,-0.4) L2(-6.8,-0.4) L3(-6,-0.4) L4(-5.2,-0.4) L5(-4.4,-0.4) L6(-3.6,-0.4) L7(-2.8,-0.4) L8(-2,-0.4) L9(-1.2,-0.4) L10(-0.4,-0.4) L11(0.4,-0.4) L12(1.2,-0.4) L13(2,-0.4) L14(2.8,-0.4) L15(3.6,-0.4) L16(4.4,-0.4) L17(5.2,-0.4) L18(6,-0.4) L19(6.8,-0.4) L20(7.6,-0.4) M1(-7.6,-1.2) M2(-6.8,-1.2) M3(-6,-1.2) M4(-5.2,-1.2) M5(-4.4,-1.2) M6(-3.6,-1.2) M7(-2.8,-1.2) M8(-2,-1.2) M9(-1.2,-1.2) M10(-0.4,-1.2) M11(0.4,-1.2) M12(1.2,-1.2) M13(2,-1.2) M14(2.8,-1.2) M15(3.6,-1.2) M16(4.4,-1.2) M17(5.2,-1.2) M18(6,-1.2) M19(6.8,-1.2) M20(7.6,-1.2) N1(-7.6,-2) N2(-6.8,-2) N3(-6,-2) N4(-5.2,-2) N5(-4.4,-2) N6(-3.6,-2) N7(-2.8,-2) N8(-2,-2) N9(-1.2,-2) N10(-0.4,-2) N11(0.4,-2) N12(1.2,-2) N13(2,-2) N14(2.8,-2) N15(3.6,-2) N16(4.4,-2) N17(5.2,-2) N18(6,-2) N19(6.8,-2) N20(7.6,-2) P1(-7.6,-2.8) P2(-6.8,-2.8) P3(-6,-2.8) P4(-5.2,-2.8) P5(-4.4,-2.8) P6(-3.6,-2.8) P7(-2.8,-2.8) P8(-2,-2.8) P9(-1.2,-2.8) P10(-0.4,-2.8) P11(0.4,-2.8) P12(1.2,-2.8) P13(2,-2.8) P14(2.8,-2.8) P15(3.6,-2.8) P16(4.4,-2.8) P17(5.2,-2.8) P18(6,-2.8) P19(6.8,-2.8) P20(7.6,-2.8) R1(-7.6,-3.6) R2(-6.8,-3.6) R3(-6,-3.6) R4(-5.2,-3.6) R5(-4.4,-3.6) R6(-3.6,-3.6) R7(-2.8,-3.6) R8(-2,-3.6) R9(-1.2,-3.6) R10(-0.4,-3.6) R11(0.4,-3.6) R12(1.2,-3.6) R13(2,-3.6) R14(2.8,-3.6) R15(3.6,-3.6) R16(4.4,-3.6) R17(5.2,-3.6) R18(6,-3.6) R19(6.8,-3.6) R20(7.6,-3.6) T1(-7.6,-4.4) T2(-6.8,-4.4) T3(-6,-4.4) T4(-5.2,-4.4) T5(-4.4,-4.4) T6(-3.6,-4.4) T7(-2.8,-4.4) T8(-2,-4.4) T9(-1.2,-4.4) T10(-0.4,-4.4) T11(0.4,-4.4) T12(1.2,-4.4) T13(2,-4.4) T14(2.8,-4.4) T15(3.6,-4.4) T16(4.4,-4.4) T17(5.2,-4.4) T18(6,-4.4) T19(6.8,-4.4) T20(7.6,-4.4) U1(-7.6,-5.2) U2(-6.8,-5.2) U3(-6,-5.2) U4(-5.2,-5.2) U5(-4.4,-5.2) U6(-3.6,-5.2) U7(-2.8,-5.2) U8(-2,-5.2) U9(-1.2,-5.2) U10(-0.4,-5.2) U11(0.4,-5.2) U12(1.2,-5.2) U13(2,-5.2) U14(2.8,-5.2) U15(3.6,-5.2) U16(4.4,-5.2) U17(5.2,-5.2) U18(6,-5.2) U19(6.8,-5.2) U20(7.6,-5.2) V1(-7.6,-6) V2(-6.8,-6) V3(-6,-6) V4(-5.2,-6) V5(-4.4,-6) V6(-3.6,-6) V7(-2.8,-6) V8(-2,-6) V9(-1.2,-6) V10(-0.4,-6) V11(0.4,-6) V12(1.2,-6) V13(2,-6) V14(2.8,-6) V15(3.6,-6) V16(4.4,-6) V17(5.2,-6) V18(6,-6) V19(6.8,-6) V20(7.6,-6) W1(-7.6,-6.8) W2(-6.8,-6.8) W3(-6,-6.8) W4(-5.2,-6.8) W5(-4.4,-6.8) W6(-3.6,-6.8) W7(-2.8,-6.8) W8(-2,-6.8) W9(-1.2,-6.8) W10(-0.4,-6.8) W11(0.4,-6.8) W12(1.2,-6.8) W13(2,-6.8) W14(2.8,-6.8) W15(3.6,-6.8) W16(4.4,-6.8) W17(5.2,-6.8) W18(6,-6.8) W19(6.8,-6.8) W20(7.6,-6.8) Y1(-7.6,-7.6) Y2(-6.8,-7.6) Y3(-6,-7.6) Y4(-5.2,-7.6) Y5(-4.4,-7.6) Y6(-3.6,-7.6) Y7(-2.8,-7.6) Y8(-2,-7.6) Y9(-1.2,-7.6) Y10(-0.4,-7.6) Y11(0.4,-7.6) Y12(1.2,-7.6) Y13(2,-7.6) Y14(2.8,-7.6) Y15(3.6,-7.6) Y16(4.4,-7.6) Y17(5.2,-7.6) Y18(6,-7.6) Y19(6.8,-7.6) Y20(7.6,-7.6)
  silkscreen extent -8.6,-8.5 8.5,8.6, body extent -8.5,-8.5 8.5,8.5, height 1.6
C_0402 [mm] "MLCC 0402"
  rrect25% 0.7x0.8 smd: 1(-0.75,0) 2(0.75,0)
  silkscreen extent -0.14,-0.47 0.14,0.47, body extent -0.8,-0.4 0.8,0.4, height 0.8
C_0805 [mm] "MLCC 0805 Cap"
  rrect25% 0.8x1.4 smd: 1(-1,0) 2(1,0)
  silkscreen extent -0.34,-0.7 0.34,0.7, body extent -1.05,-0.63 1.04,0.63, height 1.25
C_1210 [mm] "MLCC 1210 Cap"
  rrect25% 1.1x2.3 smd: 1(-1.65,0) 2(1.65,0)
  silkscreen extent -0.84,-1.41 0.84,1.41, body extent -1.6,-1.25 1.6,1.25, height 2.5
CAPC1005X50N_0402 [mm] "Chip Capacitor, 2-Leads, Body 0402, 1.00x0.50mm, IPC Medium Density"
  rrect25% 0.45x0.6 smd: 1(-0.475,0) 2(0.475,0)
  body extent -0.5,-0.25 0.5,0.25, height 0.5
"Copy of Copy of Copy of 3M-2340-6111TG_V" [mm] "THD, 40-Leads, Body 101.6x2.54mm, Pitch 2.54mm"
  round 1.55 hole 1.02: 1(2.032,1.905) 2(4.572,1.905) 3(7.112,1.905) 4(9.652,1.905) 5(12.192,1.905) 6(14.732,1.905) 7(2.032,4.445) 7(2.032,4.445) 8(4.572,4.445) 9(7.112,4.445) 10(9.652,4.445) 11(12.192,4.445) 12(14.732,4.445)
  silkscreen extent 0.76,0.64 15.88,5.72, body extent 0.76,0.64 15.88,5.72, height 8.64
"Copy of Copy of Copy of Copy of 3M-2340-6111TG_V"#1 [mm] "THD, 40-Leads, Body 101.6x2.54mm, Pitch 2.54mm"
  round 1.55 hole 1.02: 1(2.032,1.905) 2(4.572,1.905)
  silkscreen extent 0.76,0.64 5.71,3.18, body extent 0.76,0.64 5.71,3.18, height 8.64
"Copy of Copy of Copy of Copy of 3M-2340-6111TG_V"#2 [mm] "THD, 40-Leads, Body 101.6x2.54mm, Pitch 2.54mm"
  round 1.55 hole 1.02: 1(2.032,1.905) 2(4.572,1.905) 3(7.112,1.905) 4(9.652,1.905) 5(12.192,1.905) 6(14.732,1.905)
  silkscreen extent 0.76,0.64 15.88,3.18, body extent 0.76,0.64 15.88,3.18, height 8.64
"Copy of Copy of Copy of Copy of Copy of 3M-2340-6111TG_V"#1 [mm] "THD, 40-Leads, Body 101.6x2.54mm, Pitch 2.54mm"
  round 1.55 hole 1.02: 1(2.032,1.905) 2(4.572,1.905) 3(7.112,1.905)
  silkscreen extent 0.76,0.64 8.25,3.18, body extent 0.76,0.64 8.25,3.18, height 8.64
"Copy of Copy of Copy of Copy of Copy of 3M-2340-6111TG_V"#2 [mm] "THD, 40-Leads, Body 101.6x2.54mm, Pitch 2.54mm"
  round 1.55 hole 1.02: 1(2.032,1.905) 2(4.572,1.905) 3(7.112,1.905) 4(9.652,1.905)
  silkscreen extent 0.76,0.64 10.89,3.18, body extent 0.76,0.64 10.79,3.18, height 8.64
DBV0005A_L [mm] "SOT23, 5-Leads, Body 3.05x1.75mm, Pitch 0.95mm, IPC High Density"
  rrect18% 0.8x0.55 smd: 1(-1.275,0.95) 2(-1.275,0) 3(-1.275,-0.95) 4(1.275,-0.95) 5(1.275,0.95)
  silkscreen extent -1.4,-1.55 0.5,1.9, body extent -1.42,-1.46 1.42,1.46, height 1.08
ESWI-EG1218_V [mm] "THD, 3-Leads, Body 11.6x4mm, Pitch 2.5mm"
  rect 1.5x1.5 hole 1: 1(-2.5,0)
  round 1.5 hole 1: 2(0,0) 3(2.5,0)
  silkscreen extent -5.8,-2 5.8,2.77, body extent -5.8,-2 5.8,2, height 7.4
ETQP3M_4M_YFP [mm]
  rect 2.5x3.6 smd: 1(-2.35,0) 2(2.35,0)
  silkscreen extent -4.25,-2.5 2.5,2.5, body extent -2.75,-2.5 2.75,2.5, height 3
EVRL-0603-2_V [mm] "SMD, 2-Leads, Body 1.6x0.8mm"
  rect 0.8x0.8 smd: 1(-0.75,0) 2(0.75,0)
  silkscreen extent 1.65,-0.4 1.65,0.4, body extent -0.8,-0.4 0.8,0.4, height 0.5
FAIR-SOT23-5_V [mm] "SOT23, 5-Leads, Body 3x1.7mm, Pitch 0.95mm"
  rect 1x0.7 smd: 1(-1.3,0.95) 2(-1.3,0) 3(-1.3,-0.95) 4(1.3,-0.95) 5(1.3,0.95)
  silkscreen extent -1.42,-1.5 0.4,1.97, body extent -1.5,-1.5 1.5,1.5, height 1.45
FCI-10118193-0001LF-5_V [mm] "Micro, USB-B, 5-Leads, Body 7.86x5.05mm, Pitch 0.65 mm"
  rect 0.4x1.35 smd: 1(-1.3,1.325) 2(-0.65,1.325) 3(0,1.325) 4(0.65,1.325) 5(1.3,1.325)
  rect 1.6x1.4 smd: 6(-3.2,1.1) 7(3.2,1.1)
  rect 1.9x1.9 smd: 8(-1.2,-1.35) 9(1.2,-1.35)
  oval 0.9x1.6 hole 0.5 slot 1.2 at 90 deg: 10(-3.3,-1.35) 11(3.3,-1.35)
  silkscreen extent -3.93,-3.55 3.93,2.7, body extent -3.93,-4.16 3.93,1.5, height 2.83
FP-0ZCJ-MFG [mm]
  rect 1x1.9 smd paste+0 mask+0: 1(-1.5,0) 2(1.5,0)
  silkscreen extent -0.63,-0.9 0.63,0.9, body extent -1.63,-0.82 1.63,0.82, height 0.73
FP-1-1734248-5-MFG [mm]
  rect 0.6x1.65 smd paste+0 mask+0: 1(7,-1.75) 2(6,-1.75) 3(5,-1.75) 4(4,-1.75) 5(3,-1.75) 6(2,-1.75) 7(1,-1.75) 8(0,-1.75) 9(-1,-1.75) 10(-2,-1.75) 11(-3,-1.75) 12(-4,-1.75) 13(-5,-1.75) 14(-6,-1.75) 15(-7,-1.75)
  rect 0.6x1.85 smd paste+0 mask+0: 1(7,2) 2(6,2) 3(5,2) 4(4,2) 5(3,2) 6(2,2) 7(1,2) 8(0,2) 9(-1,2) 10(-2,2) 11(-3,2) 12(-4,2) 13(-5,2) 14(-6,2) 15(-7,2)
  silkscreen extent -11.55,-2.07 11.55,3.6, body extent -11.65,-2.67 11.65,3.02, height 0.25
FP-318-08-MFG [mm]
  rect 0.9x0.8 smd paste+0 mask+0: 1(-1,0.95) 2(-1,-0.95) 3(1,0)
  silkscreen extent -0.7,-1.52 0.7,1.52, body extent -1.2,-1.45 1.2,1.45, height 1.11
FP-419AD-01-MFG [mm]
  rect 0.5x0.4 smd paste+0 mask+0: 1(-0.95,0.65) 2(-0.95,0) 3(-0.95,-0.65) 4(0.95,-0.65) 5(0.95,0) 6(0.95,0.65)
  silkscreen extent -1.88,-1.1 0.3,1.1, body extent -1.3,-1.2 1.3,1.2, height 0.25
FP-502-01-MFG [mm]
  rect 0.48x0.4 smd paste+0 mask+0: 1(-0.66,0) 2(0.66,0)
  silkscreen extent -1.6,-0.75 0.65,0.75, body extent -1,-0.55 1,0.55, height 0.25
FP-1301_9316_24-MFG [mm]
  rect 2.1x1.4 smd paste+0 mask+0: 1(-5,2.25) 2(5,2.25) 3(-5,-2.25) 4(5,-2.25)
  silkscreen extent -6.72,-3 3,3, body extent -6.15,-3.1 6.15,3.1, height 0.25
FP-292303-7-MFG [mm]
  rect 3x1.25 smd paste+0 mask+0: 1(6.96,3.5) 2(6.96,1) 3(6.96,-1) 4(6.96,-3.5)
  round 3.5 hole 2.3 paste-2539.97 mask+0: 5(3.28,6.57) 6(3.28,-6.57)
  silkscreen extent 5.4,-7.47 9.15,7.47, body extent -7.1,-8.42 8.56,8.42, height 0.25
FP-ABM8G-MFG [mm]
  rect 1.4x1.2 smd paste+0 mask+0: 1(-1.1,-0.85) 2(1.1,-0.85) 3(1.1,0.85) 4(-1.1,0.85)
  silkscreen extent -2.48,-1.83 1.6,1.83, body extent -1.9,-1.55 1.9,1.55, height 0.25
FP-BLM31-0_2-t1_6-IPC_A [mm]
  rect 1.754x1.906 smd paste+0 mask+0: 1(-1.376,0) 2(1.376,0)
  silkscreen extent -0.2,-0.95 0.2,0.95, body extent -1.6,-0.8 1.6,0.8, height 1.8
FP-C04-057-IPC_A [mm]
  rect 2.306x0.622 smd paste+0 mask+0: 1(-2.432,1.905)
  rrect100% 2.306x0.622 smd paste+0 mask+0: 2(-2.432,0.635) 3(-2.432,-0.635) 4(-2.432,-1.905) 5(2.432,-1.905) 6(2.432,-0.635) 7(2.432,0.635) 8(2.432,1.905)
  silkscreen extent -4.21,-2.45 0.78,2.45, body extent -4.09,-2.95 4.09,2.95, height 0.25
FP-C04-1005-MFG [mm]
  rect 0.85x0.65 smd paste+0 mask+0: 1(-0.725,0.825) 3(-0.725,-0.825) 4(0.725,-0.825) 6(0.725,0.825)
  rect 0.85x0.25 smd paste+0 mask+0: 2(-0.725,0) 5(0.725,0)
  silkscreen extent -1.75,-1.5 1.05,1.5, body extent -1,-1.25 1,1.25, height 0.9
FP-CP-28-10-IPC_C [mm]
  rect 0.891x0.242 smd paste+0 mask+0: 1(-2.311,1.5)
  rrect100% 0.891x0.242 smd paste+0 mask+0: 2(-2.311,1) 3(-2.311,0.5) 4(-2.311,0) 5(-2.311,-0.5) 6(-2.311,-1) 7(-2.311,-1.5) 15(2.311,-1.5) 16(2.311,-1) 17(2.311,-0.5) 18(2.311,0) 19(2.311,0.5) 20(2.311,1) 21(2.311,1.5)
  rrect100% 0.242x0.891 smd paste+0 mask+0: 8(-1.5,-2.311) 9(-1,-2.311) 10(-0.5,-2.311) 11(0,-2.311) 12(0.5,-2.311) 13(1,-2.311) 14(1.5,-2.311) 22(1.5,2.311) 23(1,2.311) 24(0.5,2.311) 25(0,2.311) 26(-0.5,2.311) 27(-1,2.311) 28(-1.5,2.311)
  rect 3.24x3.24 smd paste-1000 mask+0: 29(0,0)
  silkscreen extent -3.28,-2.5 2.5,2.5, body extent -2.86,-2.86 2.86,2.86, height 0.25
FP-CP-48-13-IPC_B [mm]
  rect 0.856x0.242 smd paste+0 mask+0: 1(-3.428,2.75)
  rrect100% 0.856x0.242 smd paste+0 mask+0: 2(-3.428,2.25) 3(-3.428,1.75) 4(-3.428,1.25) 5(-3.428,0.75) 6(-3.428,0.25) 7(-3.428,-0.25) 8(-3.428,-0.75) 9(-3.428,-1.25) 10(-3.428,-1.75) 11(-3.428,-2.25) 12(-3.428,-2.75) 25(3.428,-2.75) 26(3.428,-2.25) 27(3.428,-1.75) 28(3.428,-1.25) 29(3.428,-0.75) 30(3.428,-0.25) 31(3.428,0.25) 32(3.428,0.75) 33(3.428,1.25) 34(3.428,1.75) 35(3.428,2.25) 36(3.428,2.75)
  rrect100% 0.242x0.856 smd paste+0 mask+0: 13(-2.75,-3.428) 14(-2.25,-3.428) 15(-1.75,-3.428) 16(-1.25,-3.428) 17(-0.75,-3.428) 18(-0.25,-3.428) 19(0.25,-3.428) 20(0.75,-3.428) 21(1.25,-3.428) 22(1.75,-3.428) 23(2.25,-3.428) 24(2.75,-3.428) 37(2.75,3.428) 38(2.25,3.428) 39(1.75,3.428) 40(1.25,3.428) 41(0.75,3.428) 42(0.25,3.428) 43(-0.25,3.428) 44(-0.75,3.428) 45(-1.25,3.428) 46(-1.75,3.428) 47(-2.25,3.428) 48(-2.75,3.428)
  rect 5.7x5.7 smd paste-1000 mask+0: 49(0,0)
  silkscreen extent -4.53,-3.5 3.5,3.5, body extent -3.5,-3.5 3.5,3.5, height 0.8
FP-DRB0008A-MFG [mm]
  rrect32% 0.6x0.31 smd paste+0 mask+0: 1(-1.4,0.975) 2(-1.4,0.325) 3(-1.4,-0.325) 4(-1.4,-0.975) 5(1.4,-0.975) 6(1.4,-0.325) 7(1.4,0.325) 8(1.4,0.975)
  round 1.35 smd paste-1000 mask+0: 9(0,0)
  Top Layer region: -0.75,-0.825 -0.743,-0.85 -0.725,-0.868 -0.7,-0.875 -0.7,-0.875 -0.49,-0.875 -0.471,-0.879 -0.455,-0.89 -0.444,-0.906 -0.44,-0.925 -0.44,-0.925 -0.44,-1.65 -0.433,-1.675 -0.415,-1.693 -0.39,-1.7 -0.39,-1.7 -0.26,-1.7 -0.241,-1.696 -0.225,-1.685 -0.214,-1.669 -0.21,-1.65 -0.21,-1.65 -0.21,-0.925 -0.206,-0.906 -0.195,-0.89 -0.179,-0.879 -0.16,-0.875 -0.16,-0.875 0.16,-0.875 0.179,-0.879 0.195,-0.89 0.206,-0.906 0.21,-0.925 0.21,-0.925 0.21,-1.65 0.217,-1.675 0.235,-1.693 0.26,-1.7 0.26,-1.7 0.39,-1.7 0.415,-1.693 0.433,-1.675 0.44,-1.65 0.44,-1.65 0.44,-0.925 0.444,-0.906 0.455,-0.89 0.471,-0.879 0.49,-0.875 0.49,-0.875 0.7,-0.875 0.725,-0.868 0.743,-0.85 0.75,-0.825 0.75,-0.825 0.75,0.825 0.743,0.85 0.725,0.868 0.7,0.875 0.7,0.875 0.49,0.875 0.471,0.879 0.455,0.89 0.444,0.906 0.44,0.925 0.44,0.925 0.44,1.65 0.433,1.675 0.415,1.693 0.39,1.7 0.39,1.7 0.26,1.7 0.235,1.693 0.217,1.675 0.21,1.65 0.21,1.65 0.21,0.925 0.206,0.906 0.195,0.89 0.179,0.879 0.16,0.875 0.16,0.875 -0.16,0.875 -0.179,0.879 -0.195,0.89 -0.206,0.906 -0.21,0.925 -0.21,0.925 -0.21,1.65 -0.214,1.669 -0.225,1.685 -0.241,1.696 -0.26,1.7 -0.26,1.7 -0.39,1.7 -0.415,1.693 -0.433,1.675 -0.44,1.65 -0.44,1.65 -0.44,0.925 -0.444,0.906 -0.455,0.89 -0.471,0.879 -0.49,0.875 -0.49,0.875 -0.7,0.875 -0.719,0.871 -0.735,0.86 -0.746,0.844 -0.75,0.825 -0.75,0.825
  silkscreen extent -2.43,-1.55 1.55,1.55, body extent -1.5,-1.5 1.5,1.5, height 1
FP-HFJ11-1G01ERL-MFG [mm]
  rect 1.39x1.39 hole 0.89 paste-2539.97 mask+0: 1(-5.715,8.995)
  round 1.39 hole 0.89 paste-2539.97 mask+0: 2(-4.445,6.455) 3(-3.175,8.995) 4(-1.905,6.455) 5(-0.635,8.995) 6(0.635,6.455) 7(1.905,8.995) 8(3.175,6.455) 9(4.445,8.995) 10(5.715,6.455)
  round 2.45 hole 1.6 paste-2539.97 mask+0: 15(-7.745,3.155) 16(7.745,3.155)
  round 3.25 hole 3.25 unplated paste-2539.97 mask+0: ""(-5.715,0.105) ""(5.715,0.105)
  silkscreen extent -10.05,-10.8 10.05,11.39, body extent -10.15,-10.89 10.15,10.89, height 0.25
FP-IHLP-2020CZ-FP_1_905x2-MFG [mm]
  rect 1.905x2.79 smd paste+0 mask+0: 1(-2.425,0) 2(2.425,0)
  silkscreen extent -2.72,-2.72 2.72,2.72, body extent -2.74,-2.59 2.75,2.59, height 3
FP-MPZ2012-MFG [mm]
  rect 0.8x1.2 smd paste+0 mask+0: 1(-0.9,0) 2(0.9,0)
  silkscreen extent -0.13,-0.72 0.13,0.72, body extent -1,-0.63 1,0.63, height 1.05
FP-PG-WSON-8-IPC_A [mm]
  rect 1.061x0.392 smd paste+0 mask+0: 1(-3.926,1.905)
  rrect100% 1.061x0.392 smd paste+0 mask+0: 2(-3.926,0.635) 3(-3.926,-0.635) 4(-3.926,-1.905) 5(3.926,-1.905) 6(3.926,-0.635) 7(3.926,0.635) 8(3.926,1.905)
  rect 4.75x4.9 smd paste-1000 mask+0: 9(0,0)
  silkscreen extent -5.38,-3 4,3, body extent -4.96,-3.5 4.96,3.5, height 0.25
FP-RVC0020A-IPC_A [mm]
  rect 0.956x0.192 smd paste+0 mask+0: 1(-1.478,1.25)
  rrect100% 0.956x0.192 smd paste+0 mask+0: 2(-1.478,0.75) 3(-1.478,0.25) 4(-1.478,-0.25) 5(-1.478,-0.75) 6(-1.478,-1.25) 11(1.478,-1.25) 12(1.478,-0.75) 13(1.478,-0.25) 14(1.478,0.25) 15(1.478,0.75) 16(1.478,1.25)
  rrect100% 0.192x0.956 smd paste+0 mask+0: 7(-0.75,-1.978) 8(-0.25,-1.978) 9(0.25,-1.978) 10(0.75,-1.978) 17(0.75,1.978) 18(0.25,1.978) 19(-0.25,1.978) 20(-0.75,1.978)
  rect 1.7x2.7 smd paste-1000 mask+0: 21(0,0)
  silkscreen extent -2.63,-2 1.5,2, body extent -1.5,-2 1.5,2, height 0.8
FP-TAJD-MFG [mm]
  rect 2x3 smd paste+0 mask+0: 1(-3,0) 2(3,0)
  silkscreen extent -3.75,-2.25 4.97,2.25, body extent -4.1,-2.35 4.1,2.35, height 0.25
GTL2002GM125 [mm]
  rect 0.4x0.22 smd: 1(-0.6,0.5) 2(-0.6,0) 3(-0.6,-0.5) 5(0.6,-0.5) 6(0.6,0) 7(0.6,0.5)
  rect 0.22x0.4 smd: 4(0,-0.6) 8(0,0.6)
  silkscreen extent -1.2,0.55 -1.1,0.65, body extent -0.8,-0.8 0.8,0.8, height 0.6
MCHP-QFN-32-5x5_V2 [mm] "QFN, 32-Leads, Body 5x5mm, Pitch 0.5mm, Thermal Pad 3.3x3.3mm"
  oval 0.69x0.28 smd paste-1 mask+0.07: 1(-2.62,1.75) 2(-2.62,1.25) 3(-2.62,0.75) 4(-2.62,0.25) 5(-2.62,-0.25) 6(-2.62,-0.75) 7(-2.62,-1.25) 8(-2.62,-1.75) 17(2.62,-1.75) 18(2.62,-1.25) 19(2.62,-0.75) 20(2.62,-0.25) 21(2.62,0.25) 22(2.62,0.75) 23(2.62,1.25) 24(2.62,1.75)
  oval 0.28x0.69 smd paste-1 mask+0.07: 9(-1.75,-2.62) 10(-1.25,-2.62) 11(-0.75,-2.62) 12(-0.25,-2.62) 13(0.25,-2.62) 14(0.75,-2.62) 15(1.25,-2.62) 16(1.75,-2.62) 25(1.75,2.62) 26(1.25,2.62) 27(0.75,2.62) 28(0.25,2.62) 29(-0.25,2.62) 30(-0.75,2.62) 31(-1.25,2.62) 32(-1.75,2.62)
  rect 3.3x3.3 smd paste-2 mask+0.07: 33(0,0)
  silkscreen extent -3.64,-2.39 2.39,2.39, body extent -2.5,-2.5 2.5,2.5, height 1